# Altium PCB B049-140W-3C1A 外挂FTF屏1.3寸-协议板.PcbDoc (part 2 of 2)
Units mm, origin at the board's own origin, x right, y up, seen from the top; angles counter-clockwise.
Board outline 62.01 x 27.28 mm, 4 copper layers (Top Layer, Mid-Layer 1, Mid-Layer 2, Bottom Layer); 102 components, 214 nets, 388 pads, 599 vias.
Unrouted connection lines stored in the file: 2.
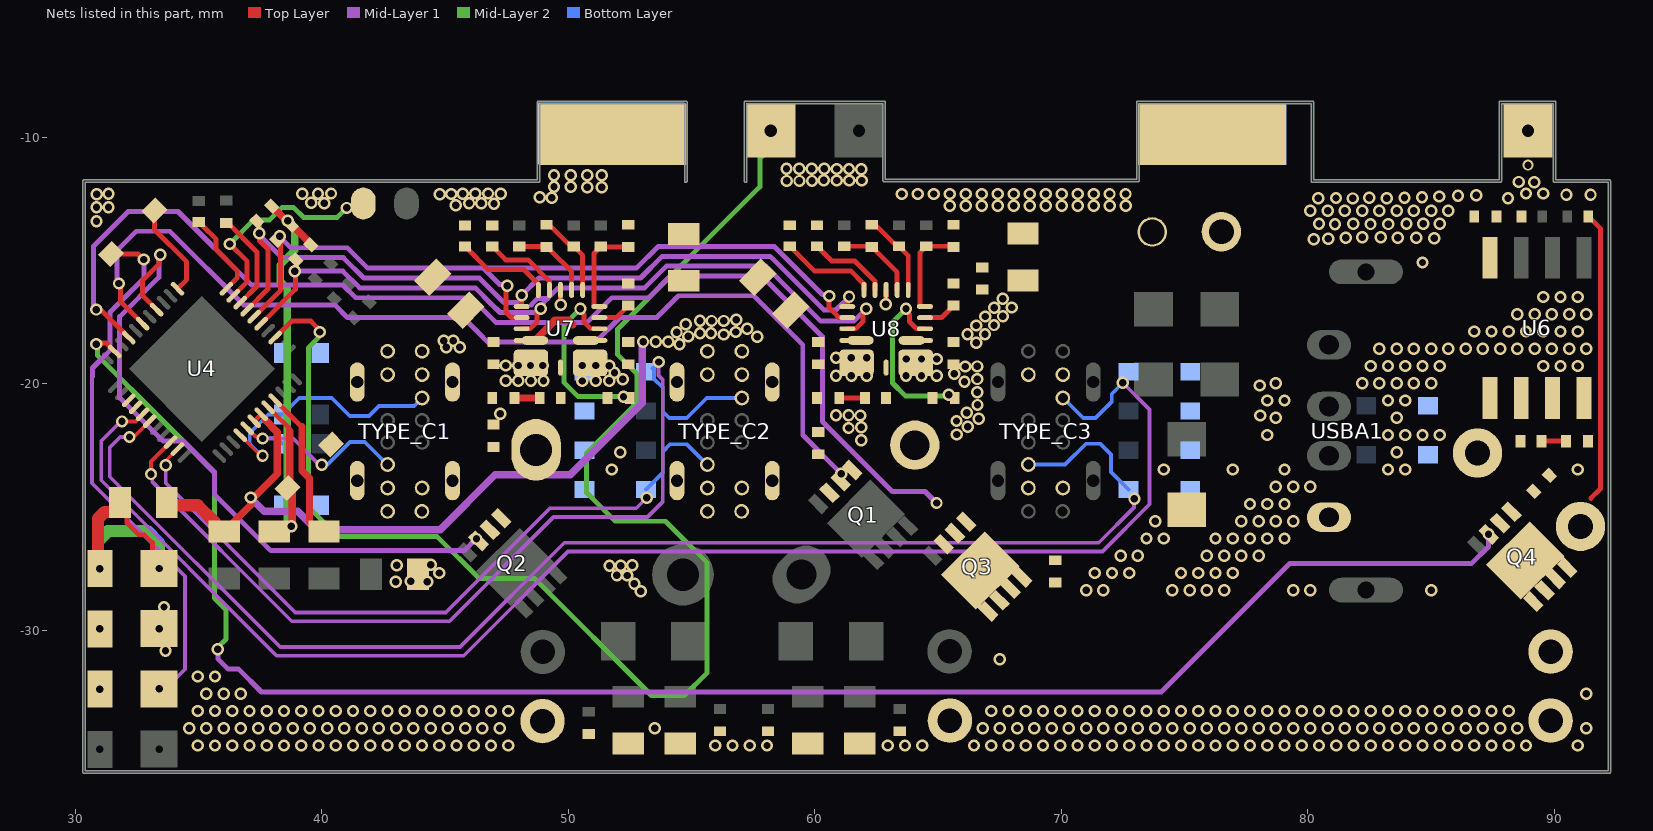
[diagram p4: the nets of this part, all layers, seen from the top]

## Via types
v1: diameter 0.5, hole 0.3, Top Layer to Bottom Layer, tented both sides, 598 vias
v2: diameter 0.45, hole 0.3, Top Layer to Bottom Layer, tented both sides, 1 vias

## Nets (pads, with @x,y where several pads share a name; then routed paths per layer and width w, separated by ;. In a path a pad name is that pad's centre, name@x,y a point inside that pad or via, vN(x,y) a via of type N, cw(c..) or ccw(c..) an arc to the next point about the centre after c; other vN are vias at no path point) (continued)
GND: C6.1 C7.1 C11.1 C17.1 C24.1 C25.1 C26.2 C55.2 C72.1 C73.1 C74.1 C75.1 C76.1 C77.2 C78.1 C79.1 C80.1 C81.2 C82.1 C83.1 C84.1 C85.1 C86.1 C87.1 C88.1 C89.1 C92.2 C93.2 C94.2 C95.2 C116.2 C117.1 C118.1 ESD2.1 ESD4.1 ESD5.1 ESD6.1 ESD7.1 ESD8.1 ESD9.1 ESD10.1 ESD11.1 ESD12.1 ESD13.1 ESD14.1 ESD15.1 ESD16.1 ESD17.1 JUMP2.2 pad.2@30.99,-29.946 pad.2@33.39,-29.94 pad.2@88.94,-9.728 pad.GND@51.79,-9.878 pad.GND@76.115,-9.878 R1.2 R5.2 R21.2 R22.1 R55.2 R56.2 TYPE_C1. TYPE_C1.A1 TYPE_C1.A12 TYPE_C1.B1 TYPE_C1.B12 TYPE_C2. TYPE_C2.A1 TYPE_C2.A12 TYPE_C2.B1 TYPE_C2.B12 U6.7 U6.8 U7.5 U7.7 U7.14 U8.5 U8.7 U8.14 | length 1.2
  Top Layer w0.2: U7.14@49.68,-16.192 49.68,-16.78 v1(49.69,-16.79) ; v1(62.88,-16.78) 62.892,-16.768 U8.14@62.892,-16.192
  other v1: 34.96,-34.68 35.66,-34.68 36.36,-34.68 37.06,-34.68 37.76,-34.68 38.46,-34.68 39.16,-34.68 39.86,-34.68 40.56,-34.68 41.26,-34.68 41.96,-34.68 42.66,-34.68 43.36,-34.68 44.06,-34.68 44.76,-34.68 45.46,-34.68 46.16,-34.68 46.86,-34.68 47.56,-34.68 55.96,-34.68 56.66,-34.68 57.36,-34.68 58.06,-34.68 62.96,-34.68 63.66,-34.68 64.36,-34.68 66.46,-34.68 67.16,-34.68 67.86,-34.68 68.56,-34.68 69.26,-34.68 69.96,-34.68 70.66,-34.68 71.36,-34.68 72.06,-34.68 72.76,-34.68 73.46,-34.68 74.16,-34.68 74.86,-34.68 75.56,-34.68 76.26,-34.68 76.96,-34.68 77.66,-34.68 78.36,-34.68 79.06,-34.68 79.76,-34.68 80.46,-34.68 81.16,-34.68 81.86,-34.68 82.56,-34.68 83.26,-34.68 83.96,-34.68 84.66,-34.68 85.36,-34.68 86.06,-34.68 86.76,-34.68 87.46,-34.68 88.16,-34.68 88.86,-34.68 90.96,-34.68 34.61,-33.98 35.31,-33.98 36.01,-33.98 36.71,-33.98 37.41,-33.98 38.11,-33.98 38.81,-33.98 39.51,-33.98 40.21,-33.98 40.91,-33.98 41.61,-33.98 42.31,-33.98 43.01,-33.98 43.71,-33.98 44.41,-33.98 45.11,-33.98 45.81,-33.98 46.51,-33.98 47.21,-33.98 53.51,-33.98 66.81,-33.98 67.51,-33.98 68.21,-33.98 68.91,-33.98 69.61,-33.98 70.31,-33.98 71.01,-33.98 71.71,-33.98 72.41,-33.98 73.11,-33.98 73.81,-33.98 74.51,-33.98 75.21,-33.98 75.91,-33.98 76.61,-33.98 77.31,-33.98 78.01,-33.98 78.71,-33.98 79.41,-33.98 80.11,-33.98 80.81,-33.98 81.51,-33.98 82.21,-33.98 82.91,-33.98 83.61,-33.98 84.31,-33.98 85.01,-33.98 85.71,-33.98 86.41,-33.98 87.11,-33.98 87.81,-33.98 88.51,-33.98 91.31,-33.98 34.96,-33.28 35.66,-33.28 36.36,-33.28 37.06,-33.28 37.76,-33.28 38.46,-33.28 39.16,-33.28 39.86,-33.28 40.56,-33.28 41.26,-33.28 41.96,-33.28 42.66,-33.28 43.36,-33.28 44.06,-33.28 44.76,-33.28 45.46,-33.28 46.16,-33.28 46.86,-33.28 47.56,-33.28 67.16,-33.28 67.86,-33.28 68.56,-33.28 69.26,-33.28 69.96,-33.28 70.66,-33.28 71.36,-33.28 72.06,-33.28 72.76,-33.28 73.46,-33.28 74.16,-33.28 74.86,-33.28 75.56,-33.28 76.26,-33.28 76.96,-33.28 77.66,-33.28 78.36,-33.28 79.06,-33.28 79.76,-33.28 80.46,-33.28 81.16,-33.28 81.86,-33.28 82.56,-33.28 83.26,-33.28 83.96,-33.28 84.66,-33.28 85.36,-33.28 86.06,-33.28 86.76,-33.28 87.46,-33.28 88.16,-33.28 35.31,-32.58 36.01,-32.58 36.71,-32.58 91.31,-32.58 34.96,-31.88 35.66,-31.88 67.51,-31.18 33.65,-30.83 33.59,-29.06 52.93,-28.42 71.01,-28.38 71.71,-28.38 74.51,-28.38 75.21,-28.38 75.91,-28.38 76.61,-28.38 79.41,-28.38 80.11,-28.38 85.01,-28.38 52.68,-28.11 44.27,-28.04 43,-28.03 43.6,-28.01 52.39,-27.78 51.97,-27.77 44.76,-27.68 71.36,-27.68 72.06,-27.68 72.76,-27.68 74.86,-27.68 75.56,-27.68 76.26,-27.68 76.96,-27.68 51.67,-27.38 52.13,-27.38 43.03,-27.37 44.42,-27.35 52.59,-27.36 72.41,-26.98 73.11,-26.98 75.91,-26.98 76.61,-26.98 77.31,-26.98 78.01,-26.98 73.46,-26.28 74.16,-26.28 76.26,-26.28 76.96,-26.28 77.66,-26.28 78.36,-26.28 79.06,-26.28 73.81,-25.58 77.31,-25.58 78.01,-25.58 78.71,-25.58 79.41,-25.58 77.66,-24.88 78.36,-24.88 79.06,-24.88 78.71,-24.18 79.41,-24.18 80.11,-24.18 51.76,-23.48 74.16,-23.48 76.96,-23.48 79.06,-23.48 83.26,-23.48 83.96,-23.48 90.96,-23.48 52.11,-22.78 83.61,-22.78 61.88,-22.29 78.36,-22.08 83.26,-22.08 83.96,-22.08 84.66,-22.08 85.36,-22.08 65.76,-22.06 61.37,-21.795 61.88,-21.77 66.21,-21.74 65.75,-21.51 66.65,-21.42 78.71,-21.38 83.61,-21.38 60.86,-21.278 61.37,-21.28 61.85,-21.29 78.07,-21.29 47.23,-21.22 47.23,-21.22 47.23,-21.22 47.23,-21.22 66.17,-21.18 66.6,-20.86 78.36,-20.68 79.06,-20.68 83.26,-20.68 83.96,-20.68 66.585,-20.34 78.06,-20.07 78.71,-19.98 82.21,-19.98 82.91,-19.98 83.61,-19.98 84.31,-19.98 85.01,-19.98 66.074,-19.922 50.56,-19.89 51.11,-19.88 47.46,-19.878 47.97,-19.878 48.48,-19.878 48.99,-19.878 51.66,-19.878 52.2,-19.818 66.585,-19.81 60.86,-19.68 61.485,-19.68 62.11,-19.68 63.7,-19.68 64.328,-19.68 64.953,-19.68 65.66,-19.59 51.87,-19.56 66.1,-19.3 66.586,-19.297 82.56,-19.28 83.26,-19.28 83.96,-19.28 84.66,-19.28 85.36,-19.28 89.56,-19.28 90.26,-19.28 90.96,-19.28 47.46,-19.26 47.96,-19.26 48.46,-19.26 48.96,-19.26 50.56,-19.26 51.11,-19.26 51.66,-19.262 63.703,-18.994 64.328,-18.994 64.953,-18.994 60.86,-18.94 61.485,-18.94 62.11,-18.94 82.91,-18.58 83.61,-18.58 84.31,-18.58 85.01,-18.58 85.71,-18.58 86.41,-18.58 87.11,-18.58 87.81,-18.58 88.51,-18.58 89.21,-18.58 89.91,-18.58 90.61,-18.58 91.31,-18.58 86.76,-17.88 87.46,-17.88 88.16,-17.88 88.86,-17.88 89.56,-17.88 90.26,-17.88 90.96,-17.88 88.51,-17.18 89.21,-17.18 89.91,-17.18 90.61,-17.18 91.31,-17.18 89.56,-16.48 90.26,-16.48 90.96,-16.48 84.66,-15.08 80.24,-14.14 80.83,-14.11 85.13,-14.09 81.55,-14.07 83.66,-14.07 84.4,-14.08 82.21,-14.05 82.96,-14.05 81.11,-13.53 80.46,-13.51 81.85,-13.51 82.55,-13.52 83.27,-13.52 84.01,-13.51 84.69,-13.51 85.36,-13.51 30.85,-13.4 80.11,-12.98 80.81,-12.98 81.51,-12.98 82.21,-12.98 82.91,-12.98 83.61,-12.98 84.31,-12.98 85.01,-12.98 85.71,-12.98 30.85,-12.84 31.338,-12.84 65.477,-12.781 66.125,-12.781 66.774,-12.781 67.422,-12.781 68.071,-12.781 68.719,-12.781 69.368,-12.781 70.017,-12.781 70.665,-12.781 71.314,-12.781 71.962,-12.781 72.611,-12.781 45.43,-12.75 40.095,-12.671 45.97,-12.68 46.47,-12.68 46.98,-12.69 39.56,-12.66 80.43,-12.47 81.83,-12.48 83.21,-12.47 88.13,-12.47 49.33,-12.45 81.15,-12.46 82.5,-12.45 83.93,-12.45 48.843,-12.431 84.64,-12.43 85.34,-12.4 86.1,-12.37 86.84,-12.35 90.5,-12.33 91.48,-12.33 30.86,-12.31 31.338,-12.287 39.204,-12.29 39.84,-12.29 44.78,-12.31 45.25,-12.3 45.71,-12.29 47.26,-12.29 63.53,-12.3 64.179,-12.3 64.827,-12.3 65.476,-12.3 66.124,-12.3 66.773,-12.3 67.421,-12.3 68.07,-12.3 68.719,-12.3 69.367,-12.3 70.016,-12.3 70.664,-12.3 71.313,-12.3 71.961,-12.3 72.61,-12.3 40.37,-12.28 46.22,-12.28 46.74,-12.28 88.86,-12.28 89.56,-12.28 50.093,-12.011 50.77,-12.02 51.352,-12.02 49.416,-12.005 88.57,-11.81 89.19,-11.82 58.856,-11.769 59.376,-11.769 59.886,-11.769 60.364,-11.742 60.89,-11.75 61.4,-11.75 61.91,-11.75 49.416,-11.54 50.093,-11.54 50.77,-11.54 51.352,-11.54 61.88,-11.3 58.85,-11.278 59.37,-11.27 59.88,-11.27 60.38,-11.27 60.885,-11.283 61.385,-11.283
  other v2: 88.94,-11.128
GND_C1: 
GND_C2: 
GND_C4: 
HG1: 
HG2: 
I2C_SCL: D1.1 pad.2@30.99,-32.39 pad.2@33.39,-32.384 | length 21.1
  Top Layer w0.2: D1.1@31.437,-14.733 32.537,-14.733 v1(32.764,-14.96)
  Mid-Layer 1 w0.15: 30.69,-19.71 30.665,-19.735 30.665,-24.036 34.44,-27.811 34.44,-31.59 pad.2@33.99,-32.04
  Mid-Layer 1 w0.2: 30.69,-19.71 30.69,-19.36 31.39,-18.66 31.39,-17.108 32.777,-15.721 32.777,-14.973 v1(32.764,-14.96)
I2C_SDA: 
IFB1: 
IFB2: 
IFB3: 
IFB3-1: 
IIC_SCL: R3.2 U4.6 U7.3 U8.3 | length 32
  Top Layer w0.2: U4.6@37.532,-17.559 38.92,-16.171 38.92,-15.45 v1(38.9,-15.43) ; v1@38.92,-15.35 38.92,-15.329 38.977,-15.272 38.977,-15.003 R3.2@38.942,-14.968 ; U7.3@48.105,-17.767 48.446,-17.767 48.73,-17.483 48.73,-17.152 v1@48.73,-16.998 ; U8.3@61.317,-17.767 61.658,-17.767 61.96,-17.465 61.96,-17.165 62.085,-17.041 v1(62.085,-16.96)
  Mid-Layer 1 w0.2: v1(38.9,-15.43) 40.85,-15.43 41.53,-16.11 46.223,-16.11 46.875,-16.763 47.223,-17.11 48.64,-17.11 ; 48.496,-16.798 48.759,-16.535 49.167,-16.535 ; v1(48.872,-16.96) 48.872,-16.83 49.167,-16.535 ; v1(62.085,-16.96) 61.584,-17.46 60.246,-17.46 58.016,-15.23 53.971,-15.23 53.091,-16.11 49.592,-16.11 49.167,-16.535
IIC_SDA: R4.2 U4.7 U7.2 U8.2 | length 32.1
  Top Layer w0.2: U4.7@37.249,-17.276 38.324,-16.202 38.324,-14.047 v1(38.288,-14.012) ; v1(47.521,-16.025) 47.521,-16.107 47.46,-16.168 47.46,-17.09 47.687,-17.317 U7.2@48.105,-17.317 ; v1(60.58,-16.44) 60.58,-16.921 60.927,-17.267 ; 60.957,-17.317 U8.2@61.317,-17.317
  Mid-Layer 1 w0.2: v1(38.288,-14.012) 38.288,-14.039 38.729,-14.48 41.031,-14.48 41.861,-15.31 52.76,-15.31 53.64,-14.43 58.358,-14.43 60.31,-16.383 60.523,-16.383 v1(60.58,-16.44) ; 46.594,-15.35 47.207,-15.963 47.212,-15.968 47.464,-15.968 v1(47.521,-16.025)
LCD_CLK: 
LCD_CS: 
LCD_DC: 
LCD_EN2: 
LCD_MOSI: 
LCD_RES: 
LCD_TE: 
LEDA: 
LG1: 
LG2: 
NetC2_1: 
NetC2_2: 
NetC4_2: 
NetC8_2: C8.2 U4.49 | length 5.8
  Top Layer w0.2: U4.49@38.097,-20.671 38.856,-21.429 39.19,-21.763
  Top Layer w0.3: 39.19,-21.748 39.19,-21.763 39.19,-23.532 39.493,-23.835 39.493,-25.603 C8.2@39.695,-25.805
NetC12_2: 
NetC13_2: 
NetC15_2: 
NetC24_2: C24.2 R18.2 | length 1
  Top Layer w0.2: R18.2@89.49,-22.33 C24.2@90.48,-22.33
NetC26_2: 
NetC67_2: 
NetC72_2: C72.2 R49.2 | length 1
  Top Layer w0.3: C72.2@47.807,-20.578 R49.2@48.838,-20.578
NetC73_2: C73.2 R50.2 | length 1.1
  Top Layer w0.2: C73.2@60.99,-20.578 R50.2@62.04,-20.578
NetC90_1: C90.1 U7.9 | length 7.2
  Top Layer w0.2: v1(50.488,-16.96) 50.488,-17.041 50.63,-17.183 50.63,-17.483 50.914,-17.767 U7.9@51.255,-17.767
  Mid-Layer 2 w0.2: v1(50.488,-16.96) 49.83,-17.617 49.83,-19.96 50.395,-20.525 v1(52.238,-20.525)
NetC91_1: C91.1 U8.9 | length 7.1
  Top Layer w0.2: 63.842,-17.183 63.842,-17.483 64.127,-17.767 U8.9@64.467,-17.767 ; v1(65.43,-20.44) 65.568,-20.578 C91.1@65.68,-20.578
  Mid-Layer 2 w0.2: v1(63.7,-16.96) 63.15,-17.51 63.15,-19.97 63.67,-20.49 65.38,-20.49 v1(65.43,-20.44)
NetC94_1: C94.1 R51.2 U7.11 | length 3.9
  Top Layer w0.2: U7.11@51.255,-16.867 51.038,-16.867 51.038,-14.705 51.167,-14.575 51.167,-14.525 51.267,-14.425 R51.2@51.317,-14.425 51.342,-14.45 C94.1@52.427,-14.45
NetC95_1: C95.1 R52.2 U8.11 | length 3.9
  Top Layer w0.2: U8.11@64.467,-16.867 64.272,-16.867 64.272,-14.67 64.372,-14.57 64.372,-14.52 64.472,-14.42 65.605,-14.42 C95.1@65.63,-14.445
NetC96_1: C96.1 R57.2 U7.13 | length 3.3
  Top Layer w0.2: R57.2@48.009,-14.425 49.137,-14.425 49.262,-14.55 49.262,-14.575 50.13,-15.443 U7.13@50.13,-16.192
NetC96_2: C96.2 R53.2 U7.12 | length 3.4
  Top Layer w0.2: C96.2@49.112,-13.55 49.22,-13.55 50.095,-14.425 R53.2@50.215,-14.425 50.58,-14.79 U7.12@50.58,-16.192
NetC97_1: C97.1 R58.2 U8.13 | length 3.3
  Top Layer w0.2: R58.2@61.197,-14.42 62.28,-14.42 C97.1@62.305,-14.445 63.342,-15.482 U8.13@63.342,-16.192
NetC97_2: C97.2 R54.2 U8.12 | length 3.4
  Top Layer w0.2: C97.2@62.305,-13.545 62.455,-13.545 63.33,-14.42 R54.2@63.413,-14.42 63.792,-14.799 U8.12@63.792,-16.192
NetL2_1: L2.1 R18.1 U6.5 U6.6
NetQ5_G: 
NetQ6_G: 
NetR1_1: R1.1 U8.15 | length 3.3
  Top Layer w0.2: R1.1@60.088,-14.42 60.688,-15.02 61.626,-15.02 62.442,-15.837 U8.15@62.442,-16.192
NetR5_1: R5.1 U7.15 | length 3.3
  Top Layer w0.2: R5.1@46.907,-14.425 47.452,-14.97 48.366,-14.97 49.23,-15.834 U7.15@49.23,-16.192
NetR7_1: 
NetR8_1: 
NetR11_2: 
NetR19_2: R19.2 U4.11 | length 3.6
  Top Layer w0.2: R19.2@35,-13.44 35.05,-13.44 35.15,-13.54 35.15,-13.59 35.703,-14.143 35.703,-14.555 36.562,-15.413 36.562,-15.701 U4.11@36.117,-16.145
NetR55_1: R55.1 U7.16 | length 3.8
  Top Layer w0.2: R55.1@45.804,-14.425 46.749,-15.37 48.2,-15.37 48.78,-15.95 U7.16@48.78,-16.192
NetR56_1: R56.1 U8.16 | length 3.9
  Top Layer w0.2: R56.1@58.98,-14.42 59.98,-15.42 61.46,-15.42 61.992,-15.952 U8.16@61.992,-16.192
NetR76_1: 
NetR77_1: 
NetRT1_1: RT1.1 U4.10 | length 9.1
  Top Layer w0.2: v1(36.253,-14.327) 36.962,-15.035 36.962,-15.866 U4.10@36.4,-16.428 ; v1(41.002,-12.865) 41.06,-12.808 41.562,-12.808 RT1.1@41.68,-12.69
  Mid-Layer 2 w0.2: v1(36.253,-14.327) 37.232,-13.348 37.874,-13.348 38.382,-12.84 38.838,-12.84 39.248,-13.25 40.618,-13.25 v1(41.002,-12.865)
NetU2_14: 
NetU4_46: 
NTC1: 
NTC1-1: 
OPTO1: 
OPTO2: 
OPTO3: 
P0_CC1: ESD12.2 TYPE_C1.A5 U4.45 | length 8
  Top Layer w0.15: U4.45@36.966,-21.802 37.304,-22.14 37.327,-22.14 37.341,-22.154 37.523,-22.154 v1(37.59,-22.221)
  Mid-Layer 1 w0.15: v1(37.59,-22.221) 38.831,-22.221 39.902,-23.292 v1(39.997,-23.292)
  Bottom Layer w0.15: v1(37.59,-22.221) 37.599,-22.211 38.181,-22.211 ESD12.2@38.4,-22.43 ; v1(39.997,-23.292) 40.207,-23.292 41.139,-22.36 41.732,-22.36 42.652,-23.28 TYPE_C1.A5@42.665,-23.28
P0_CC2: ESD13.2 TYPE_C1.B5 U4.44 | length 10.6
  Top Layer w0.15: U4.44@36.683,-22.085 37.519,-22.921 v1(37.59,-22.921)
  Bottom Layer w0.15: v1(37.59,-22.921) 37.548,-22.921 37.065,-22.438 37.065,-22.003 37.818,-21.25 ESD13.2@38.4,-21.25 39.075,-20.575 40.394,-20.575 41.129,-21.31 41.911,-21.31 42.316,-20.905 43.74,-20.905 TYPE_C1.B5@44.065,-20.58
P1_CC1: ESD7.2 TYPE_C2.A5 U4.37 | length 29.3
  Top Layer w0.15: v1(33.662,-23.303) 33.662,-23.126 U4.37@34.137,-22.65
  Mid-Layer 1 w0.15: v1(33.662,-23.303) 33.662,-24.032 38.915,-29.285 45.025,-29.285 49.255,-25.055 52.755,-25.055 v1(53.18,-24.63)
  Bottom Layer w0.15: ESD7.2@53.15,-24.29 53.835,-23.605 53.835,-22.745 54.13,-22.45 54.797,-22.45 55.627,-23.28 TYPE_C2.A5@55.64,-23.28
P1_CC2: ESD8.2 TYPE_C2.B5 U4.36 | length 38.7
  Top Layer w0.15: v1(33.063,-23.666) 33.063,-23.159 U4.36@33.855,-22.368
  Mid-Layer 1 w0.15: v1(33.063,-23.666) 33.118,-23.72 33.118,-23.983 38.77,-29.635 45.17,-29.635 49.4,-25.405 53.205,-25.405 53.835,-24.775 53.835,-19.843 53.66,-19.668 53.66,-19.126 v1(53.668,-19.117)
  Bottom Layer w0.15: v1(53.668,-19.117) 53.41,-19.376 53.475,-19.441 53.475,-19.805 53.835,-20.165 53.835,-21.135 54.09,-21.39 54.806,-21.39 55.616,-20.58 TYPE_C2.B5@57.04,-20.58
P2_CC1: ESD6.2 TYPE_C3.A5 U4.33 | length 55.7
  Top Layer w0.15: 32.433,-22.092 U4.33@33.006,-21.519
  Mid-Layer 1 w0.15: v1(32.19,-22.159) 31.819,-22.159 31.392,-22.586 31.392,-23.773 38.304,-30.685 45.605,-30.685 49.835,-26.455 71.525,-26.455 72.954,-25.026 72.954,-24.689 v1@72.97,-24.673
  Bottom Layer w0.15: TYPE_C3.A5@68.665,-23.28 70.152,-23.28 70.992,-22.44 71.59,-22.44 72.02,-22.87 72.02,-23.58 ESD6.2@72.73,-24.29
  other v1: 72.97,-24.67
P2_CC2: ESD2.2 TYPE_C3.B5 U4.32 | length 60.7
  Top Layer w0.15: v1(31.885,-21.529) 32.431,-21.529 U4.32@32.723,-21.236
  Mid-Layer 1 w0.15: v1(31.885,-21.529) 31.836,-21.529 31.042,-22.323 31.042,-23.918 38.159,-31.035 45.75,-31.035 49.98,-26.805 71.67,-26.805 73.585,-24.89 73.585,-21.045 v1(72.5,-19.96)
  Bottom Layer w0.15: TYPE_C3.B5@70.065,-20.58 70.078,-20.58 70.888,-21.39 71.389,-21.39 72.055,-20.724 72.055,-20.405 v1(72.5,-19.96)
P3_CC1: U4.31
P3_CC2: U4.30
PB7: 
PB8: 
PD14: D1.2 U4.16 | length 3.9
  Top Layer w0.2: D1.2@33.205,-12.965 33.205,-13.745 34.51,-15.05 34.51,-15.773 U4.16@34.137,-16.145
PF3: 
PFC: pad.2@58.215,-9.728 U4.4 | length 58.4
  Top Layer w0.2: U4.4@38.097,-18.125 38.762,-17.46 39.55,-17.46 39.96,-17.87 39.93,-17.9 v1(39.91,-17.9)
  Mid-Layer 2 w0.2: v1(39.91,-17.9) 39.91,-18.074 39.447,-18.538 39.447,-24.991 40.646,-26.19 44.66,-26.19 46.37,-27.9 48.62,-27.9 53.37,-32.65 54.7,-32.65 55.63,-31.72 55.63,-27.27 53.94,-25.58 51.894,-25.58 50.74,-24.426 50.74,-22.8 52.65,-20.89 52.787,-20.752 52.787,-19.611 52,-18.824 52,-17.78 57.77,-12.01 57.77,-10.864 58.215,-10.419 pad.2@58.215,-9.728
PFC1: 
PFC-FB: 
PLUG1: 
PLUG2: 
PLUG2-1: 
QB1: 
QB2: 
QE1: 
QE2: 
RESET: C12.2 U4.9 | length 4.1
  Top Layer w0.2: C12.2@36.11,-13.47 36.174,-13.47 37.362,-14.657 37.362,-16.032 U4.9@36.683,-16.711
RST: 
RX: 
SD59D31_INT: R2.2 U4.8 U7.1 U8.1 | length 32.1
  Top Layer w0.2: U4.8@36.966,-16.994 37.81,-16.15 37.81,-14.54 37.459,-14.189 v1(37.459,-13.898) 37.459,-13.496 R2.2@37.362,-13.398 ; U7.1@48.105,-16.867 48.106,-16.41 v1(48.107,-16.41) ; U8.1@61.317,-16.867 61.317,-16.543 v1(61.39,-16.47)
  Mid-Layer 1 w0.2: v1(37.459,-13.898) 37.459,-13.961 38.379,-14.88 40.865,-14.88 41.695,-15.71 46.388,-15.71 47.041,-16.363 47.388,-16.71 47.932,-16.71 48.107,-16.535 v1(48.107,-16.41) 48.806,-15.71 52.925,-15.71 53.805,-14.83 58.192,-14.83 60.362,-17 60.86,-17 v1(61.39,-16.47)
SW1: C90.2 R49.1 U7.6 U?.2
SW1-1: 
SW2: C91.2 L6.1 R50.1 U8.6
SW2-1: 
SW3: 
SW3-1: 
SWCLK: 
SWDIO: 
TX: 
VBUS1: C11.2 Q2.S TYPE_C1.A4 TYPE_C1.A9 TYPE_C1.B4 TYPE_C1.B9 U4.19 | length 27.2
  Top Layer w0.2: U4.19@33.289,-16.994 32.711,-16.416 32.711,-15.819 33.38,-15.15 33.38,-14.816 v1(33.435,-14.761) ; v1(46.273,-26.297) Q2.S@46.355,-26.379
  Mid-Layer 1 w0.2: v1(33.435,-14.761) 33.38,-14.816 33.38,-15.684 31.79,-17.274 31.79,-20.57 33.54,-22.32 34.358,-22.32 35.64,-23.602 35.64,-24.058 35.631,-24.067 35.631,-24.481 37.925,-26.775 45.775,-26.775 46.253,-26.297 v1(46.273,-26.297)
VBUS2: C6.2 Q1.S TYPE_C2.A4 TYPE_C2.A9 TYPE_C2.B4 TYPE_C2.B9 U4.21 | length 40.9
  Top Layer w0.2: v1(31.761,-15.932) 31.761,-16.013 31.83,-16.082 31.83,-16.666 U4.21@32.723,-17.559
  Mid-Layer 1 w0.2: v1(31.761,-15.932) 31.677,-15.848 31.677,-14.597 32.463,-13.811 33.828,-13.811 36.817,-16.8 40.523,-16.8 41.033,-17.31 45.726,-17.31 46.378,-17.963 46.726,-18.31 51.091,-18.31 52.091,-17.31 53.588,-17.31 54.468,-16.43 57.519,-16.43 59.51,-18.421 59.51,-22.082 v1(61.076,-23.648)
VBUS3: C7.2 Q3.S TYPE_C3.A4 TYPE_C3.A9 TYPE_C3.B4 TYPE_C3.B9 U4.23 | length 47.8
  Top Layer w0.2: v1(30.84,-16.99) 31.023,-16.99 U4.23@32.158,-18.125 ; v1(64.94,-24.84) 64.95,-24.83 v1@65.05,-24.83
  Mid-Layer 1 w0.2: v1(30.84,-16.99) 30.73,-16.88 30.73,-14.413 32.132,-13.011 34.16,-13.011 37.149,-16 40.854,-16 41.364,-16.51 46.057,-16.51 46.71,-17.163 47.057,-17.51 50.76,-17.51 51.76,-16.51 53.257,-16.51 54.137,-15.63 57.85,-15.63 60.31,-18.09 60.31,-21.539 63.141,-24.37 64.47,-24.37 v1(64.94,-24.84)
VBUS4: C17.2 Q4.S U4.25 USBA1.1 | length 71.1
  Top Layer w0.2: v1(30.84,-18.39) 30.877,-18.353 31.255,-18.353 U4.25@31.592,-18.691
  Mid-Layer 1 w0.2: v1(35.777,-30.771) 35.777,-31.163 36.198,-31.584 36.618,-31.584 37.544,-32.51 74.06,-32.51 79.28,-27.29 86.658,-27.29 87.299,-26.649 87.34,-26.608 v1(87.34,-26.1)
  Mid-Layer 2 w0.2: v1(30.84,-18.39) 30.897,-18.448 30.897,-18.863 33.567,-21.533 33.571,-21.533 35.64,-23.602 35.64,-25.816 35.631,-25.825 35.631,-28.701 36.105,-29.175 36.105,-30.361 35.777,-30.69 v1(35.777,-30.771)
VBUS_C1: 
VBUS_C2: 
VBUS_C3: 
VBUS_C4: 
VCC5V: 
VCC_1: C92.1 U7.10 | length 1.4
  Top Layer w0.2: U7.10@51.255,-17.317 51.939,-17.317 C92.1@52.427,-16.829
VCC_2: C93.1 U8.10 | length 1.4
  Top Layer w0.2: U8.10@64.467,-17.317 65.142,-17.317 C93.1@65.63,-16.829
VCC_3: 
VDD: 
VDD5: C1.2 ESD11.2 R2.1 R3.1 R4.1 U4.48 | length 21.5
  Top Layer w0.2: U4.48@37.814,-20.953 38.69,-21.829 38.69,-21.927
  Top Layer w0.3: R2.1@37.963,-12.797 38.518,-13.352 38.572,-13.352 v1(38.61,-13.39) 39.543,-14.323 R3.1@39.543,-14.367 ; C1.2@38.06,-26 38.54,-26 v1(38.76,-25.78) 38.76,-25.726 38.8,-25.686 38.8,-24.429 ESD11.2@38.605,-24.235 38.605,-23.952 38.69,-23.867 38.69,-21.927 ; R4.1@38.61,-13.444 R4.1@38.748,-13.582
  Mid-Layer 2 w0.3: v1(38.61,-13.39) 38.9,-13.68 38.9,-14.581 38.3,-15.181 38.3,-15.84 38.597,-16.137 38.597,-25.617 v1(38.76,-25.78)
VFB1: 
VFB2: 
VFB3: 
VFB3-1: 
VIN: C3.2 C25.2 C55.1 C84.2 C85.2 C86.2 C87.2 C88.2 C89.2 C116.1 C117.2 C118.2 pad.GND@51.72,-9.84 pad.GND@76.15,-9.87 R10.2 U4.46 U4.47 U6.4 U7.4 U7.8 U8.4 U8.8 | length 32.6
  Top Layer w0.2: U4.46@37.249,-21.519 U4.47@37.532,-21.236 ; v1(45.048,-18.517) 45.062,-18.517 45.318,-18.26 v1(45.332,-18.26)
  Top Layer w0.3: C3.2@36.03,-26 37.108,-24.922 v1(37.108,-24.615) 37.235,-24.615 38.19,-23.66 38.19,-21.965 U4.47@37.691,-21.467 ; C84.2@45.84,-17.02 C84.2@45.945,-17.02 ; U7.4@48.638,-18.242 49.342,-17.539 49.342,-17.535 49.447,-17.43 50,-17.43 50.18,-17.61
  Top Layer w0.5: R10.2@33.7,-24.82 33.7,-24.93 34.96,-24.93 35.645,-25.615 35.645,-25.805 35.839,-26 C3.2@36.03,-26
  Mid-Layer 1 w0.3: v1(37.108,-24.615) 37.108,-24.638 37.65,-25.18 39.02,-25.18 39.765,-25.925 44.795,-25.925 47.02,-23.7 50.08,-23.7 53,-20.78 53,-18.32 v1(53.03,-18.29)
  other v1: 45.59,-18.518 54.51,-18.4 66.552,-18.341 53.54,-18.3 54.05,-18.3 44.943,-18.26 54.87,-18.08 57.67,-18.09 56.3,-18 66.195,-17.992 66.905,-17.987 55.34,-17.95 55.786,-17.944 54.39,-17.91 56.79,-17.9 57.26,-17.77 66.548,-17.638 67.273,-17.619 54.766,-17.579 55.81,-17.45 56.31,-17.45 55.34,-17.44 56.81,-17.4 66.916,-17.27 67.633,-17.259 67.277,-16.91 67.987,-16.905 67.63,-16.556
VIN+: pad.2@30.99,-27.503 pad.2@33.39,-27.496 R10.1 | length 15.9
  Top Layer w0.2: R10.1@31.75,-24.93 32.094,-25.275 32.094,-25.654 32.568,-26.128 32.793,-26.128 33.115,-26.451 33.115,-26.925 pad.2@33.12,-26.93
  Top Layer w0.5: pad.2@30.99,-27.503 30.915,-27.503 30.915,-25.465 31.175,-25.205 31.605,-25.205 31.8,-25.011 R10.1@31.8,-24.82 ; pad.2@33.265,-27.371 pad.2@33.39,-27.496
  Mid-Layer 2 w0.5: pad.2@30.88,-27.11 30.968,-27.022 30.915,-27.022 30.915,-26.388 31.325,-25.978 32.855,-25.978 33.39,-26.513 pad.2@33.39,-27.496
  Bottom Layer w0.5: pad.2@30.99,-27.503 30.915,-27.428 30.915,-26.388 31.325,-25.978 32.918,-25.978 33.39,-26.45 pad.2@33.39,-27.496
VIN-1: 
VIN-2: 
VIN_1: 
VIN_2: 
VIN_3: 
VIN_3V: 
VOUT4: C26.1 L2.2 Q3.D Q4.D R20.2 | length 11.8
  Top Layer w0.2: R20.2@91.385,-13.21 91.89,-13.715 91.89,-24.25 91.49,-24.65
pads on no net: U4.1 U4.12 U4.13 U4.14 U4.15 U4.17 U4.26 U4.27 U4.39 U4.40 U4.52 U6.2 USBA1.

## Polygon pours and split planes (outlines as drawn)
VIN+ on Top Layer "VIN+_L01_P075" (solid, remove dead copper, pour order 75): 30.18,-24.02 30.32,-24.16 30.32,-28.51 30.46,-28.65 34.28,-28.65 34.21,-28.58 34.21,-26.55 34.15,-26.49 33.06,-26.49 32.09,-25.52 32.09,-24.19 32.12,-24.16
D31_CSP1 on Top Layer "D31_CSP1_L01_P001" (solid, remove dead copper, pour order 1): 54.16,-26.04 53.18,-27.02 53.18,-30.06 53.37,-30.25 53.37,-33.61 56.53,-33.61 56.87,-33.27 56.87,-27.81 55.1,-26.04
CSP2 on Top Layer "CSP2_L01_P072" (solid, remove dead copper, pour order 72): 38.92,-15.81 38.184,-16.546 38.184,-18.887 40.363,-18.887 41.22,-18.03 41.18,-17.99 41.18,-15.37
GND on Top Layer "GND_L01_P066" (solid, remove dead copper, pour order 66): 29.32,-3.72 28.21,-4.83 28.21,-40.71 95.15,-40.71 95.71,-40.15 94.13,-38.57 94.13,-1.49 35.26,-1.49 33.68,-3.07
VIN on Top Layer "VIN_L01_P031" (solid, remove dead copper, pour order 31): 75.89,-13.02 74.27,-14.64 68.42,-14.64 67.27,-15.79 66.55,-15.79 66.21,-16.13 66.21,-16.73 65.98,-16.96 59.9,-16.96 59.15,-16.21 58.31,-17.05 57.86,-17.05 56.14,-15.33 53.94,-15.33 52.46,-16.81 46.62,-16.81 46.02,-16.21 45.88,-16.21 44.31,-17.78 44.31,-18.5 44.71,-18.9 67.02,-18.9 69.68,-16.24 78.79,-16.24 80.23,-17.68 85.84,-17.68 87.7,-15.82 87.7,-13.67 86.97,-12.94 86.53,-12.94 83.57,-15.9 80.82,-15.9 77.94,-13.02 77,-13.02
VIN on Top Layer "VIN_L01_P027" (solid, remove dead copper, pour order 27): 33.063,-25.663 34.044,-26.645 37.225,-26.645 38.856,-25.014 38.856,-21.429 37.869,-21.429 37.02,-20.58 33.934,-23.666 33.063,-23.666
AGND on Top Layer "AGND_L01_P024" (solid, remove dead copper, pour order 24): 30.43,-11.68 30.43,-24.265 34.57,-28.405 34.57,-28.47 42.42,-28.47 42.5,-28.39 42.5,-26.62 41.85,-25.97 38.86,-25.97 38.86,-20.306 42.46,-16.706 42.46,-16.66 44.25,-14.87 44.25,-11.91 30.94,-11.91 30.79,-11.76
VBUS4 on Top Layer "VBUS4_L01_P022" (solid, remove dead copper, pour order 22): 89.15,-23.94 89.77,-24.56 89.77,-24.89 89.65,-24.89 87.43,-27.11 80.37,-27.11 79.88,-26.62 79.88,-25.04 80.29,-24.63 88.4,-24.63 89.09,-23.94
CSP3 on Top Layer "CSP3_L01_P018" (solid, remove dead copper, pour order 18): 75.03,-16.24 75.03,-18.88 78.7,-18.88 79.81,-19.99 81.06,-19.99 81.8,-19.25 81.8,-18.03 81.45,-17.68 80.23,-17.68 78.79,-16.24
CSN on Top Layer "CSN_L01_P017" (solid, remove dead copper, pour order 17): 72.07,-19.14 72.07,-22.9 72.17,-23 77.59,-23 77.75,-22.84 77.75,-19.14
CSP2 on Top Layer "CSP2_L01_P015" (solid, remove dead copper, pour order 15): 74.96,-16.25 69.67,-16.25 67.14,-18.78 67.14,-25.95 68.63,-27.44 70.58,-27.44 72.05,-25.97 72.05,-18.92 74.96,-18.92
VBUS3 on Top Layer "VBUS3_L01_P014" (solid, remove dead copper, pour order 14): 63.984,-25.156 65.36,-23.78 65.36,-23.21 67.81,-20.76 67.81,-19.55 68.19,-19.17 70.51,-19.17 70.76,-19.42 70.76,-26.82 70.14,-27.44 68.63,-27.44 67.08,-25.89 66.65,-25.89 64.92,-27.62 64.426,-27.126 64.25,-27.126 63.984,-26.86
SW2 on Top Layer "SW2_L01_P013" (solid, remove dead copper, pour order 13): 62.28,-17.896 62.28,-23.74 63.84,-25.3 65.36,-23.78 65.36,-20.62 65.09,-20.35 63.85,-20.35 63.41,-19.91 63.41,-17.919 63.271,-17.78
VBUS2 on Top Layer "VBUS2_L01_P012" (solid, remove dead copper, pour order 12): 57.36,-18.75 54.79,-18.75 54.32,-19.22 54.32,-25.26 56.792,-27.732 57.058,-27.732 58.37,-26.42 59.61,-26.42 62.2,-23.83 62.33,-23.83 60.83,-22.33 59.8,-22.33 59.67,-22.2 59.67,-21.47 56.98,-18.78 56.81,-18.78
NetL2_1 on Top Layer "NETL2_1_L01_P010" (solid, remove dead copper, pour order 10): 89,-19.66 86.23,-19.66 85.87,-20.02 85.87,-23.4 86.36,-23.89 87.87,-23.89 89.04,-22.72 89.04,-19.72 88.96,-19.64
VOUT4 on Top Layer "VOUT4_L01_P008" (solid, remove dead copper, pour order 8): 64.9,-27.66 69.4,-32.16 90.47,-32.16 92.15,-30.48 92.15,-25.07 91.52,-24.44 90.13,-24.44 85.13,-29.44 70.23,-29.44 66.71,-25.92 66.71,-25.89 66.65,-25.89 64.92,-27.62
SW1 on Top Layer "SW1_L01_P006" (solid, remove dead copper, pour order 6): 49.28,-17.73 49.28,-20.43 47.65,-22.06 47.65,-23.527 48.101,-23.978 49.492,-23.978 51.96,-21.51 51.96,-20.41 51.84,-20.29 50.69,-20.29 50.06,-19.66 50.06,-18.02 50.12,-17.96
VBUS1 on Top Layer "VBUS1_L01_P005" (solid, remove dead copper, pour order 5): 41.25,-18.03 41.25,-26.71 45.08,-26.71 46.05,-27.68 47.9,-25.83 47.9,-22.67 43.26,-18.03
D31_VOUT2 on Top Layer "D31_VOUT2_L01_P004" (solid, remove dead copper, pour order 4): 62.33,-23.83 60.08,-26.08 60.92,-26.92 60.92,-33.13 61.34,-33.55 64.18,-33.55 66.43,-31.3 66.43,-30.32 64.25,-28.14 64.25,-26.37 64.25,-25.71 62.47,-23.93
D31_CSP2 on Top Layer "D31_CSP2_L01_P002" (solid, remove dead copper, pour order 2): 59.97,-26.06 58.62,-26.06 56.87,-27.81 56.87,-33.27 57.17,-33.57 60.13,-33.57 60.72,-32.98 60.72,-28.48 60.72,-26.81
D31_VOUT1 on Top Layer "D31_VOUT1_L01_P000" (solid, remove dead copper, pour order 0): 47.9,-25.83 46.05,-27.68 46.05,-29.53 50.1,-33.58 53.32,-33.58 53.32,-30.15 49,-25.83 48.02,-25.83
P2_CC1 on Bottom Layer "P2_CC1_L04_P051" (solid, remove dead copper, pour order 51): 70.03,-21.43 69.49,-21.43 68.44,-22.48 68.44,-23.53 71.98,-23.53 72.83,-24.38 73.08,-24.13 73.08,-21.34
DN0 on Bottom Layer "DN0_L04_P050" (solid, remove dead copper, pour order 50): 37.19,-20.87 37.19,-23.47 36.97,-23.69 38.88,-23.69 38.98,-23.79 40.36,-22.41 40.36,-20.85 40.23,-20.72 38.65,-20.72
GND on Bottom Layer "GND_L04_P049" (solid, remove dead copper, pour order 49): 26.34,1.87 24.82,0.35 24.82,-37.17 92.82,-37.17 94.77,-39.12 96.8,-37.09 96.8,-1.01
VIN on Bottom Layer "VIN_L04_P032" (solid, remove dead copper, pour order 32): 48.75,-8.33 48.75,-11.21 48.74,-11.22 51.32,-11.22 51.7,-11.6 51.7,-16.287 50.938,-17.049 45.371,-17.049 44.69,-17.73 44.69,-18.52 45.05,-18.88 75.1,-18.88 79.61,-14.37 79.61,-8.5 49.14,-8.5 48.91,-8.27
IIC_SDA on Mid-Layer 1 "IIC_SDA_L02_P074" (solid, remove dead copper, pour order 74): 60.59,-15.25 60.04,-15.8 60.04,-17.11 60.146,-17.216 60.201,-17.161 62.625,-17.161 62.625,-15.555 62.61,-15.54
IIC_SCL on Mid-Layer 1 "IIC_SCL_L02_P073" (solid, remove dead copper, pour order 73): 38.379,-14.88 38.28,-14.979 38.28,-16.07 40.924,-16.07 41.109,-16.255 41.16,-16.204 41.16,-15.01
VIN on Mid-Layer 1 "VIN_L02_P071" (solid, remove dead copper, pour order 71): 67.57,-15.84 67.51,-15.84 65.28,-18.07 66.939,-19.729 68.165,-19.729 68.165,-17.635 69.66,-16.14
VIN on Mid-Layer 1 "VIN_L02_P070" (solid, remove dead copper, pour order 70): 44.405,-17.71 44.348,-17.767 44.348,-19.206 46.066,-19.206 46.23,-19.37 46.23,-17.79
GND on Mid-Layer 1 "GND_L02_P067" (solid, remove dead copper, pour order 67): 25.6,-0.61 25.46,-0.75 25.46,-37.7 93.97,-37.7 98.04,-33.63 98.04,-3.77 27.63,-3.77 26.02,-5.38
IIC_SCL on Mid-Layer 1 "IIC_SCL_L02_P046" (solid, remove dead copper, pour order 46): 60,-16.11 60.04,-16.15 60.04,-17.83 62.4,-17.83 62.54,-17.97 62.77,-17.74 62.77,-16.03
GND on Mid-Layer 1 "GND_L02_P045" (solid, remove dead copper, pour order 45): 52.9,-18.14 52.9,-25.09 52.76,-25.23 52.92,-25.39 55.13,-25.39 55.13,-17.56 55.06,-17.49
DN2 on Mid-Layer 1 "DN2_L02_P044" (solid, remove dead copper, pour order 44): 72.09,-21.53 72.1,-21.54 72.1,-25.54 73.69,-25.54 74.18,-25.05 74.18,-20.61
VIN on Mid-Layer 1 "VIN_L02_P043" (solid, remove dead copper, pour order 43): 52.63,-17.32 52.63,-18.84 52.74,-18.95 52.97,-18.72 58.36,-18.72 58.36,-17.44 58.54,-17.26 58.06,-16.78 58.06,-16.19 54.01,-16.19 53.82,-16
IIC_SCL on Mid-Layer 1 "IIC_SCL_L02_P042" (solid, remove dead copper, pour order 42): 49.11,-15.37 47.95,-16.53 47.95,-17.32 47.98,-17.35 49.04,-17.35 50.47,-15.92 50.47,-15.32
IIC_SDA on Mid-Layer 1 "IIC_SDA_L02_P041" (solid, remove dead copper, pour order 41): 45.95,-14.75 49.11,-14.75 49.15,-14.79 49.15,-15.32 48.04,-16.43 48.02,-16.41 46.96,-16.41 46.96,-15.95 45.73,-14.72
AGND on Mid-Layer 1 "AGND_L02_P040" (solid, remove dead copper, pour order 40): 37.9,-26.72 37.9,-27.28 39.22,-28.6 41.55,-28.6 41.81,-28.34 41.81,-26.77
VDD5 on Mid-Layer 1 "VDD5_L02_P039" (solid, remove dead copper, pour order 39): 37.04,-24.46 37.04,-25.44 38.06,-26.46 40.25,-26.46 40.25,-25.69 40.33,-25.61 39.28,-24.56 37.14,-24.56
VBUS1 on Mid-Layer 1 "VBUS1_L02_P038" (solid, remove dead copper, pour order 38): 31.7,-19.65 31.7,-22.99 32.86,-24.15 35.18,-24.15 35.18,-23.37 35.27,-23.28 31.85,-19.86 31.85,-19.71
I2C_SCL on Mid-Layer 1 "I2C_SCL_L02_P037" (solid, remove dead copper, pour order 37): 30.5,-23.76 30.39,-23.87 30.39,-29.04 32.17,-29.04 32.56,-28.65 32.56,-24.3
I2C_SCL on Mid-Layer 1 "I2C_SCL_L02_P036" (solid, remove dead copper, pour order 36): 31.88,-17.21 31.88,-22.98 30.7,-24.16 30.32,-23.78 30.32,-18.48 31.7,-17.1
CSP2 on Mid-Layer 1 "CSP2_L02_P023" (solid, remove dead copper, pour order 23): 67.01,-18.7 67.01,-25.69 67.11,-25.79 71.2,-25.79 71.8,-25.19 71.8,-18.77 71.05,-18.02 67.63,-18.02 66.98,-18.67
VIN on Mid-Layer 2 "VIN_L03_P069" (solid, remove dead copper, pour order 69): 67.8,-15.84 67.8,-15.847 65.745,-17.902 66.87,-19.027 66.87,-18.659 68.369,-17.16
VIN on Mid-Layer 2 "VIN_L03_P068" (solid, remove dead copper, pour order 68): 52.63,-16.28 52.64,-16.29 52.64,-18.85 58.25,-18.85 58.34,-18.94 58.34,-15.95
GND on Mid-Layer 2 "GND_L03_P048" (solid, remove dead copper, pour order 48): 29.49,-3.187 29.49,-43.02 103.47,-43.02 103.69,-42.8 100.68,-39.79 100.68,-1.57 20.68,-1.57 17.14,1.97
AGND on Mid-Layer 2 "AGND_L03_P028" (solid, remove dead copper, pour order 28): 35.03,-15.89 32.01,-18.91 36.36,-23.26 36.36,-28.17 36.61,-28.42 41.63,-28.42 41.79,-28.26 41.79,-27.12 41.42,-26.75 40.64,-26.75 39.215,-25.325 40.67,-23.87 40.67,-21.4 35.16,-15.89

## Keep-outs
Keep-Out Layer:
  circle w0.1: c48.744,-11.738 r0.2
  circle w0.1: c54.794,-11.728 r0.2
  circle w0.1: c57.14,-11.74 r0.2
  circle w0.1: c62.85,-11.72 r0.2
  circle w0.1: c32.565,-26.678 r0.2
  circle w0.1: c31.615,-26.678 r0.2
  circle w0.1: c73.065,-11.703 r0.2
  circle w0.1: c90.065,-11.728 r0.2
  circle w0.1: c80.24,-11.728 r0.2
  circle w0.1: c87.765,-11.728 r0.2
  lines w0.1: 30.334,-34.242 30.334,-27.059 ; 30.34,-35.753 30.34,-11.778 48.79,-11.778 48.79,-8.578 54.765,-8.578 54.765,-11.778 57.19,-11.778 57.19,-8.578 62.815,-8.578 62.815,-11.753 73.115,-11.753 73.115,-8.578 80.19,-8.578 80.19,-11.778 87.815,-11.778 87.815,-8.578 90.015,-8.578 90.015,-11.778 92.24,-11.778 92.24,-35.753 30.34,-35.753 ; 31.565,-35.753 32.615,-35.753 32.615,-26.628 31.565,-26.628 31.565,-35.753
  text "四层板   FR-4   1OZ   1mm厚" at 94.384,-34.685 h0.8 r90

## Other copper
Top Layer:
  rectangle net FB: 60.23,-10.82 62.8,-8.62
  rectangle net PFC: 57.19,-10.82 59.82,-8.62
  rectangle net I2C_SCL: 32.6,-33.37 34.36,-31.51
  rectangle net VIN+: 32.58,-28.61 34.22,-26.67
  pour cut-out: 75.92,-17.62 75.92,-19.15 75.94,-19.17 77.1,-19.17 77.11,-19.16 77.11,-17.69 77.13,-17.67 75.99,-17.67 75.96,-17.64
  pour cut-out: 73.21,-17.64 73.21,-19.15 73.2,-19.16 74.26,-19.16 74.28,-19.14 74.28,-17.71 74.3,-17.69 73.28,-17.69 73.22,-17.63
  pour cut-out: 52.66,-29.84 54.19,-29.84 54.21,-29.86 54.21,-30.9 54.24,-30.93 52.73,-30.93 52.72,-30.92 52.72,-29.88 52.69,-29.85
  pour cut-out: 61.45,-30 61.46,-29.99 61.47,-30 61.47,-31.04 59.99,-31.04 59.96,-31.01 59.96,-30
Bottom Layer:
  rectangle net FB: 60.12,-10.82 62.8,-8.63
  rectangle net PFC: 57.21,-10.8 59.79,-8.63
  rectangle net VIN+: 32.63,-28.48 34.62,-26.52

## Silkscreen, mask and mechanical layers (free items; w line width, h text height)
Top Overlay:
  text "FB" at 60.89,-11.75 h1.5
  text "GND" at 52.33,-11.997 h1.2
  text "GND" at 87.78,-11.987 h1.2
  text "GND" at 75.21,-12.257 h1.2
  text "PFC" at 56.768,-13.828 h1.5 r45
  text "VIN+" at 35.11,-28.55 h1.52 r90
  text "GND" at 34.61,-30.48 h1.52
  text "TX" at 35.31,-32.26 h1.52
Bottom Overlay:
  text "VIN+" at 77.369,-12.3 h1.2
  text "VIN+" at 54.398,-12.561 h1.2
  text "VIN+" at 37.44,-27.98 h1.52
  text "GND" at 37.56,-30.27 h1.52
  text "TX" at 37,-32.84 h1.52
Bottom Solder:
  rectangle: 30.54,-35.753 31.565,-34.14
  rectangle: 30.49,-33.13 31.48,-31.65
  rectangle: 30.52,-30.7 31.51,-29.18
  rectangle: 30.54,-28.25 31.5,-26.84
  rectangle: 32.71,-28.17 34.21,-26.82
  rectangle: 32.65,-30.74 34.21,-29.14
  rectangle: 32.65,-33.17 34.15,-31.64
  rectangle: 32.6,-35.64 34.19,-34.11
  rectangle: 73.23,-11.05 79.95,-8.58
  rectangle: 48.73,-11.04 54.8,-8.57